# Altium PCB PCB_Adaptor_Board-v1.0.PcbDoc (part 2 of 2)
Units mil, origin at the board's own origin, x right, y up, seen from the top; angles counter-clockwise.
Board outline 5314.96 x 3492.31 mil, 2 copper layers (Top Layer, Bottom Layer), stack 61.811 mil thick; 18 components, 94 nets, 295 pads, 209 vias.
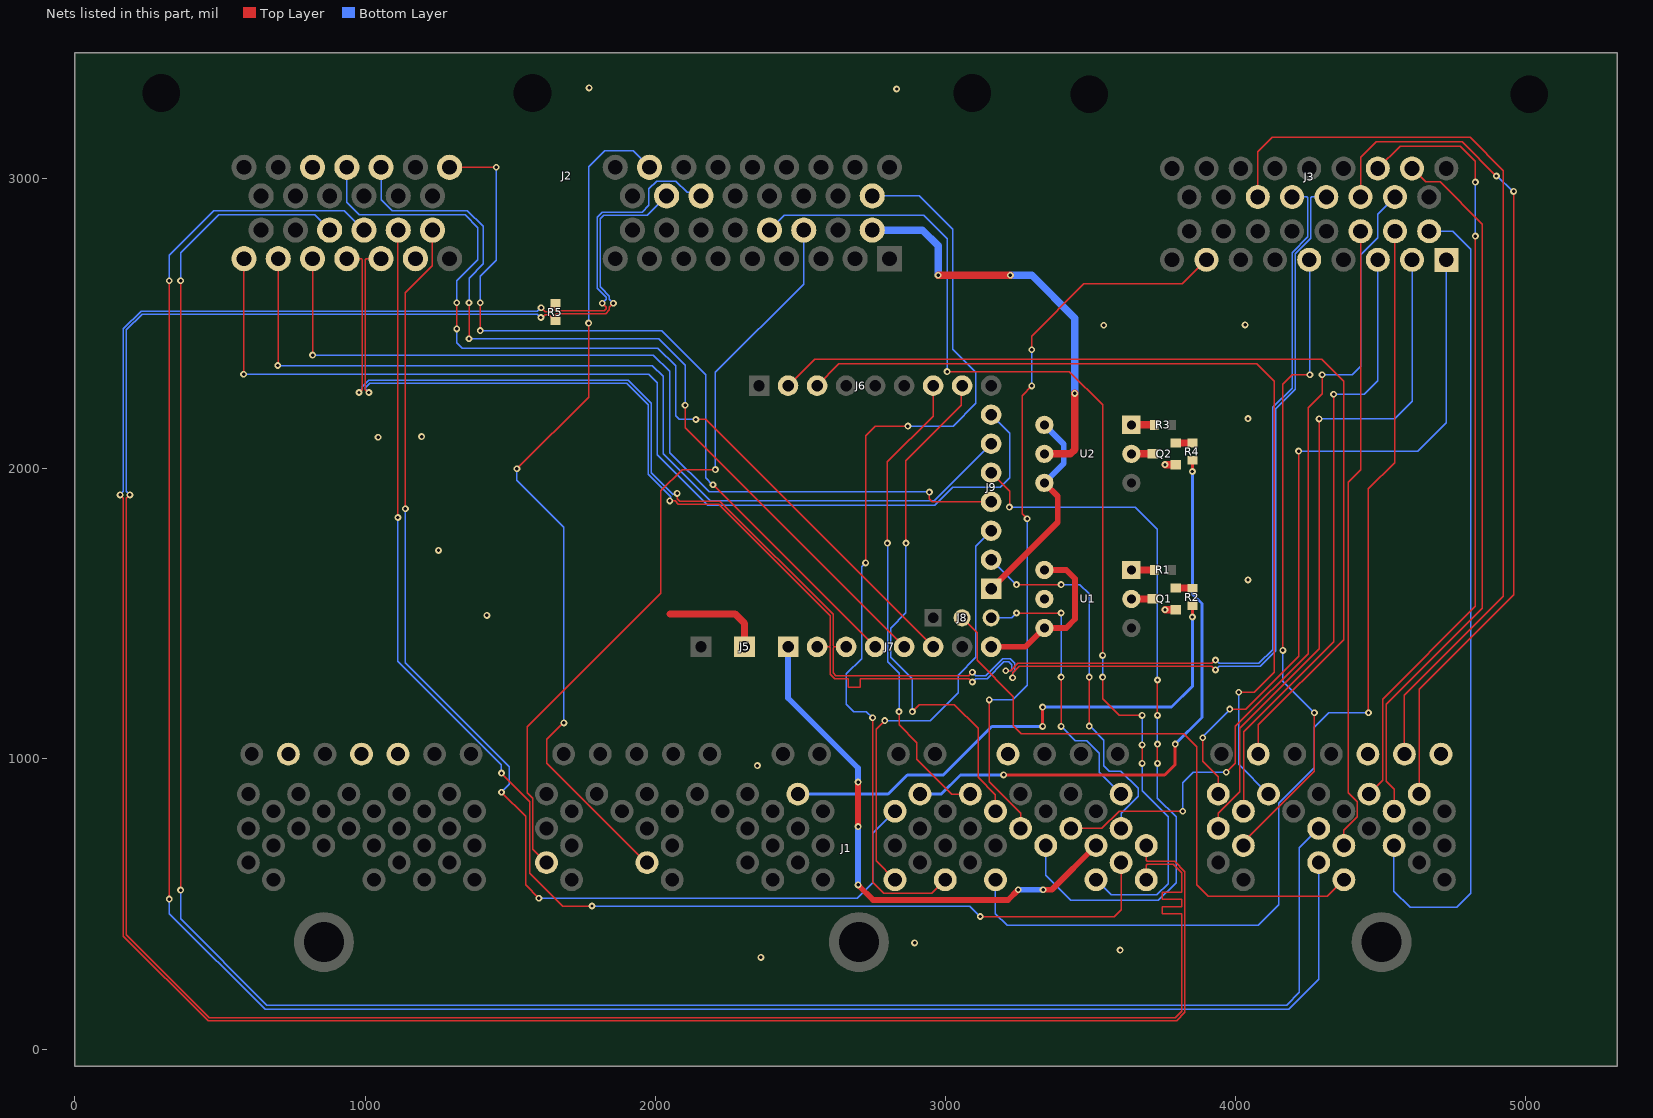
[diagram p2: the nets of this part, all layers, seen from the top]

## Via types
v1: diameter 23.62, hole 11.81, Top Layer to Bottom Layer, 209 vias

## Nets (pads, with @x,y where several pads share a name; then routed paths per layer and width w, separated by ;. In a path a pad name is that pad's centre, name@x,y a point inside that pad or via, vN(x,y) a via of type N, cw(c..) or ccw(c..) an arc to the next point about the centre after c; other vN are vias at no path point) (continued)
B33/A33: J1.B33 J2.A33 | length 2999.4
  Top Layer w5: v1(1523,2000) 1770.16,2247.16 v1(1770.16,2502.09) ; v1(1685.16,1124.12) 1682.12,1124.12 1625.39,1067.38 1625.39,985.76 1968.55,642.6 J1.B33@1971.84,642.6
  Bottom Layer w5: v1(1523,2000) 1523,1960.99 1685,1798.99 1685,1124.27 v1(1685.16,1124.12) v1@1685.16,1127.15 ; v1(1770.16,2502.09) v1(1770.16,2502.09) 1770.16,3040.87 1825.28,3096 1923.46,3096 J2.A33@1980.35,3039.12
B35/A12: J1.B35 J2.A12 | length 2669.9
  Top Layer w5: J1.B35@1625.39,642.6 1578.38,689.61 1578.38,864.25 1559.16,883.47 1559.16,1111.5 2019.38,1571.72 2019.38,1923.53 2093,1997.15 v1@2204.85,1997.15 ; v1@2204.85,1994.84 v1(2207.16,1997.15)
  Bottom Layer w5: v1(2207.16,1997.15) 2207.16,2332.18 2511.84,2636.87 J2.A12@2511.84,2822.58
C7/D-1: J1.C7 J8.3 | length 986.2
  Top Layer w5: v1(3245.16,1503) v1(3399,1503) ; v1(3399,1112.05) v1(3399,1282.26)
  Bottom Layer w5: J8.3@3157.74,1486.49 3228.65,1486.49 v1(3245.16,1503) ; v1(3399,1112.05) 3447.56,1063.48 3487.32,1063.48 3530.73,1020.07 3530.73,953.79 J1.C7@3605.7,878.82 ; v1(3399,1282.26) v1(3399,1503) ; v1@3406.16,1282.26 v1@3406.16,1287.3
C12/A-6: J1.C12 J6.8 | length 1837.1
  Top Layer w5: v1(2864.16,1744.15) 2864.16,2028.34 3054.49,2218.67 3054.49,2283.23 J6.8@3057.74,2286.49 ; v1(2886.15,1163.22) 2910.46,1187.53 3030.47,1187.53 3113,1105 3113,936.37 3172.63,876.74 J1.C12@3172.63,819.76
  Bottom Layer w5: v1(2864.16,1744.15) 2864.16,1503.67 2811.68,1451.18 2811.68,1351.06 2886.15,1276.58 v1(2886.15,1163.22)
C13/A-7: J1.C13 J6.7 | length 1628.4
  Top Layer w5: v1(2800.16,1744.15) 2800.16,2024.16 2957.74,2181.74 J6.7@2957.74,2286.49 ; v1(2840.15,1163.22) 2840.15,1118.5 2902,1056.65 2902,999.56 3022.74,878.82 J1.C13@3086.02,878.82
  Bottom Layer w5: v1(2800.16,1744.15) 2800.68,1743.63 2800.68,1335.32 2840.15,1295.85 v1(2840.15,1163.22)
C16/C8: J1.C16 J2.C8 | length 4005.1
  Top Layer w5: v1(1139.16,1862.15) 1138.52,1862.79 1138.52,2606.66 1232.31,2700.46 J2.C8@1232.31,2822.58 ; v1(1470.08,885.49) 1553.38,802.2 1553.38,565.75 v1(1599.04,520.08)
  Bottom Layer w5: v1(1139.16,1862.15) 1139.16,1331.36 1497.16,973.36 1497.16,912.57 v1(1470.08,885.49) ; v1(1599.04,520.08) 2696.08,520.08 2750,574 2750,743.59 J1.C16@2826.17,819.76
C18/A-3: J1.C18 J9.2 | length 1314.5
  Top Layer w5: v1(3245.16,1601.06) v1(3399,1601.06) ; v1(3495.74,1113.19) v1(3495.74,1282.26)
  Bottom Layer w5: J9.2@3157.74,1686.49 3158.73,1686.49 3244.17,1601.06 v1(3245.16,1601.06) ; v1(3399,1601.06) 3463.7,1601.06 3495.74,1569.01 v1(3495.74,1282.26) ; v1(3495.74,1113.19) 3496.72,1114.17 3545.73,1065.17 3545.73,977.24 3565.28,957.69 3605.05,957.69 3664.47,898.27 3664.47,871.31 3605.7,812.53 J1.C18@3605.7,760.71
C19/SGND: J1.C19 J7.1 | length 1839.8
  Top Layer w20: v1(2699,566) 2751,514 3216,514 v1(3251,549) ; v1(2699,767) v1(2699,920) ; v1(3336.86,549) 3366.43,549 J1.C19@3519.09,701.65
  Bottom Layer w20: J7.1@2457.74,1386.49 2457.74,1210.26 2699,969 v1(2699,920) ; v1(2699,566) v1(2699,767) ; v1(3251,549) v1(3336.86,549)
C20/B19: J1.C20 J3.B19 | length 2958
  Top Layer w5: J1.C20@3432.47,760.71 3539.41,760.71 3598.47,819.76 v1(3818,819.76) ; v1(3968.18,954.15) 3999.03,984.99 3999.03,1112.02 4250.16,1363.15 4250.16,2211.16 4298.16,2259.16 v1(4298.16,2324.15)
  Bottom Layer w5: v1(3818,819.76) 3818,918.19 3853.96,954.15 v1(3968.18,954.15) ; v1(4298.16,2324.15) 4402.15,2324.15 4431.13,2353.13 4431.13,2737.86 4490.19,2796.92 4490.19,2877.95 J3.B19@4549.24,2937.01
C21/A-5: J1.C21 J9.5 | length 2543.5
  Top Layer w5: J9.5@3157.74,1986.49 3221,1923.23 3221,1868.15 v1(3220.85,1868) ; v1(3731,984.8) v1(3731,1051.04) ; v1(3731,1150) v1(3731,1272)
  Bottom Layer w5: v1(3220.85,1868) 3655,1868 3731,1792 v1(3731,1272) ; J1.C21@3345.86,701.65 3345.86,599.14 3431.85,513.15 3734.15,513.15 3795.16,574.16 3795.16,800.77 3731,864.93 v1(3731,984.8) ; v1(3731,1051.04) v1(3731,1150)
C22/B8: J1.C22 J3.B8 | length 2575.1
  Top Layer w5: v1(3151,1203.38) 3151,920.78 3259.24,812.53 J1.C22@3259.24,760.71 ; v1(3281.73,1827.84) 3264.16,1845.41 3264.16,2252.51 v1(3297.66,2286.01) ; v1(3297.66,2410.15) 3297.66,2457.44 3477.48,2637.25 3816.42,2637.25 J3.B8@3899.64,2720.47
  Bottom Layer w5: v1(3151,1203.38) 3168.67,1203.64 3232,1203.64 3281.92,1253.56 3281.92,1827.65 v1(3281.73,1827.84) ; v1(3297.66,2286.01) v1(3297.66,2410.15)
C29/C9: J1.C29 J2.C9 | length 4676.1
  Top Layer w5: v1(1113.16,1832.15) 1113.16,2821.54 J2.C9@1114.2,2822.58 ; v1(1470.08,951.22) 1568.38,852.93 1568.38,606.02 1681.25,493.15 v1(1782.16,493.15) ; v1(3120,457) 3581.7,457 3605.7,481 J1.C29@3605.7,642.6
  Bottom Layer w5: v1(1113.16,1832.15) 1113.16,1336.15 1469.16,980.15 1469.16,952.15 v1(1470.08,951.22) ; v1(1782.16,493.15) 3083.85,493.15 v1(3120,457)
C30/A13: J1.C30 J2.A13 | length 3780.5
  Top Layer w5: v1(3006,2335) 3427.16,2335 3542,2220.16 v1(3542,1357) ; v1(3542,1282.26) 3542,1207 3599,1150 v1(3677.96,1150) ; v1(3677.96,984.8) v1(3677.96,1048.42)
  Bottom Layer w5: J2.A13@2393.73,2822.58 2444.54,2873.39 2925.61,2873.39 3006,2793 v1(3006,2335) ; J1.C30@3519.09,583.54 3571.48,531.15 3728.6,531.15 3768.16,570.7 3768.16,800.08 3677.96,890.28 v1(3677.96,984.8) ; v1(3542,1282.26) v1(3542,1357) ; v1@3677.96,1052.7 v1(3677.96,1150)
C31/B11: J1.C31 J3.B11 | length 3707.5
  Top Layer w5: v1(4458.16,1159.15) 4458.16,1930.65 4549.24,2021.73 J3.B11@4549.24,2818.9
  Bottom Layer w5: J1.C31@3172.63,583.54 3172.63,466.37 3212.85,426.15 4078.15,426.15 4149.48,497.48 4149.48,847.14 4272,969.66 4272,1110.04 4321.11,1159.15 v1(4458.16,1159.15)
C33/A18: J1.C33 J2.A18 | length 3299.1
  Top Layer w5: v1(2724.99,1675.67) 2724.99,2114.24 2757.74,2147 v1(2871,2147) ; v1(2749,1142.2) 2749.16,1142.04 2749.16,575.14 2787.62,536.67 2952.53,536.67 J1.C33@2999.4,583.54
  Bottom Layer w5: v1(2724.99,1675.67) 2711.16,1661.84 2711.16,1346.16 2658.85,1293.85 2658.85,1189.15 2684.78,1163.22 2728.09,1163.22 2749,1142.3 v1(2749,1142.2) ; J2.A18@2748.06,2940.69 2910.61,2940.69 3026,2825.31 3026,2411.62 3104.81,2332.81 3104.81,2225.34 3026.47,2147 v1(2871,2147)
C35/A-4: J1.C35 J9.3 | length 1486.3
  Top Layer w5: v1(2791.09,1132.15) 2761.16,1102.22 2761.16,648.56 J1.C35@2826.17,583.54
  Bottom Layer w5: v1(2791.09,1132.15) 2948.46,1132.15 3044,1227.69 3044,1289.07 3105,1350.07 3105,1733.75 J9.3@3157.74,1786.49
CAN1_N: J2.C4 J3.B21 J7.3 | length 6265.3
  Top Layer w5: J2.C4@937.04,2724.16 988.02,2724.16 990.94,2721.23 990.94,2273 980.87,2262.93 v1(979.12,2262.93) ; v1(2075.56,1915.07) 2075.56,1896.59 2084.15,1888 2223.16,1888 2612.89,1498.27 2612.89,1389.42 2615.82,1386.49 ; J7.3@2657.74,1386.49 2615.82,1386.49 ; v1(3093.18,1298.96) 3092.42,1298.96 3080.76,1287.3 2622.31,1287.3 2612.89,1296.72 2612.89,1383.56 2615.82,1386.49 ; v1(3231.9,1280.1) 3232.43,1280.64 3232.43,1297.13 3254,1318.7 3327.47,1318.7 3918.58,1318.7 3930.24,1307.04 v1(3931,1307.04)
  Bottom Layer w5: v1(979.12,2262.93) 979.12,2263.36 990.94,2275.18 990.94,2283.59 1012.66,2305.3 1906.27,2305.3 1962.28,2249.28 1986.3,2225.27 1986.3,1985.85 2061.57,1910.57 2062.51,1911.51 2072,1911.51 v1(2075.56,1915.07) ; v1(3093.18,1298.96) 3093.93,1298.96 3105.3,1287.6 3105,1287.3 3139.73,1287.3 3197.73,1345.3 3223.27,1345.3 3239.3,1329.27 3239.3,1304 3232.43,1297.13 3232.43,1280.64 v1(3231.9,1280.1) ; v1(3931,1307.04) 3931.76,1307.04 3943.42,1318.7 4084.92,1318.7 4138.79,1372.57 4138.79,2207.49 4205.13,2273.83 4205.13,2740.7 4259.12,2794.69 4259.12,2934.08 4262.05,2937.01 J3.B21@4313.02,2937.01
CAN1_P: J2.C3 J3.B22 J7.2 | length 6275.2
  Top Layer w5: v1(1013.07,2262.93) 1011.32,2262.93 1001.24,2273 1001.24,2721.23 1004.17,2724.16 J2.C3@1055.15,2724.16 ; v1(2049.8,1889.31) 2068.28,1889.31 2079.88,1877.7 2218.89,1877.7 2602.59,1494 2602.59,1389.42 2599.66,1386.49 ; J7.2@2557.74,1386.49 2599.66,1386.49 ; v1(3093.18,1265.34) 3092.42,1265.34 3080.76,1277 2721.11,1277 2705.78,1277 2705.78,1246.42 2665.78,1246.42 2665.78,1277 2623.28,1277 2618.04,1277 2602.59,1292.45 2602.59,1383.56 2599.66,1386.49 ; v1(3208.12,1303.88) 3208.66,1304.42 3225.15,1304.42 3249.73,1329 3327.47,1329 3918.58,1329 3930.24,1340.66 v1(3931,1340.66)
  Bottom Layer w5: v1(1013.07,2262.93) 1013.07,2263.36 1001.24,2275.18 1001.24,2279.32 1016.92,2295 1902,2295 1958.64,2238.36 1976,2221 1976,1981.58 2038.19,1919.39 2054.29,1903.29 2053.36,1902.36 2053.36,1892.87 v1(2049.8,1889.31) ; v1(3093.18,1265.34) 3093.93,1265.34 3105.3,1276.7 3105,1277 3144,1277 3202,1335 3219,1335 3229,1325 3229,1308.27 3225.15,1304.42 3208.66,1304.42 v1(3208.12,1303.88) ; v1(3931,1340.66) 3931.76,1340.66 3943.42,1329 4080.65,1329 4128.49,1376.84 4128.49,2211.76 4194.83,2278.1 4194.83,2744.97 4248.82,2798.96 4248.82,2934.08 4245.89,2937.01 J3.B22@4194.91,2937.01
CANHH_N: J1.C28 J2.A24 R5.2 | length 9130.9
  Top Layer w5: v1(189.32,1910.15) 189.32,1909.39 177.66,1897.73 177.66,393.65 463.16,108.15 3792.58,108.15 3815.16,130.72 3815.16,433.69 3815.16,466 3746.72,466 3746.72,491 3815.16,491 3815.16,516 3746.72,516 3746.72,541 3815.16,541 3815.16,568.5 3815.16,607.84 3785.55,637.45 3695.24,637.45 3692.31,634.52 J1.C28@3692.31,583.54 ; v1(1606.16,2521.47) 1611.2,2521.47 1620.38,2530.65 1633.15,2530.65 1653.66,2510.15 R5.2@1656.16,2510.15 1656.16,2532.07 1659.09,2535 1829.01,2535 1841.74,2547.73 1841.74,2556.66 v1(1855.75,2570.67)
  Bottom Layer w5: v1(189.32,1910.15) 189.32,1910.91 177.66,1922.57 177.66,2478.66 232.13,2533.13 1593.74,2533.13 1605.4,2521.47 v1(1606.16,2521.47) ; v1(1855.75,2570.67) 1841.74,2584.68 1841.74,2595.54 1813.6,2623.68 1810.46,2626.83 1810.46,2862.66 1822.04,2874.24 1972.95,2874.24 J2.A24@2039.4,2940.69
CANHH_P: J1.C17 J2.A23 R5.1 | length 9125.6
  Top Layer w5: v1(155.7,1910.15) 155.7,1909.39 167.36,1897.73 167.36,389.38 458.89,97.85 3792.58,97.85 3796.85,97.85 3825.46,126.46 3825.46,612.11 3789.82,647.75 3695.24,647.75 3692.31,650.68 J1.C17@3692.31,701.65 ; v1(1606.48,2555.09) 1606.92,2555.09 1621.06,2540.95 1633.13,2540.95 1641.16,2548.98 1641.16,2557.65 1653.66,2570.15 R5.1@1656.16,2570.15 1656.16,2548.23 1659.09,2545.3 1721.56,2545.3 1824.74,2545.3 1826.56,2547.11 1831.44,2552 1831.44,2556.66 v1(1817.43,2570.67)
  Bottom Layer w5: v1(155.7,1910.15) 155.7,1910.91 167.36,1922.57 167.36,2482.92 227.87,2543.43 1593.74,2543.43 1605.4,2555.09 v1(1606.48,2555.09) ; v1(1817.43,2570.67) 1831.44,2584.68 1831.44,2591.28 1803.3,2619.42 1800.16,2622.56 1800.16,2866.92 1817.78,2884.54 1954.82,2884.54 1978,2907.72 1978,2964.92 2004.58,2991.5 2070.5,2991.5 2109.63,2952.37 2145.84,2952.37 J2.A23@2157.51,2940.69
D2/B23: J1.D2 J3.B23 | length 3222.5
  Top Layer w5: J3.B23@4076.8,2937.01 4076.8,3092.8 4126,3142 4808.93,3142 4923.47,3027.46 4923.47,1560.47 4582.07,1219.07 J1.D2@4582.07,1016.61
D6/OUT-2: J1.D6 J6.2 | length 3391.1
  Top Layer w5: J6.2@2457.74,2286.49 2549.25,2378 4296.31,2378 4372.16,2302.15 4372.16,1411.16 4078.14,1117.14 J1.D6@4078.14,1016.61
D9/B20: J1.D9 J3.B20 | length 2969.3
  Top Layer w5: J3.B20@4431.13,2937.01 4431.13,3074.13 4484.71,3127.7 4780.61,3127.7 v1(4899.16,3009.15) ; J1.D9@4633.26,878.82 4633.26,1240.25 4958.16,1565.15 v1(4958.16,2956.15)
  Bottom Layer w5: v1(4899.16,3009.15) 4902.16,3009.15 4955.16,2956.15 v1(4958.16,2956.15)
D10/B27: J1.D10 J3.B27 | length 2493.7
  Top Layer w5: J1.D10@4546.64,819.76 4546.64,896.36 4520.2,922.8 4520.2,1189.2 4851.16,1520.16 4851.16,2842.84 4705.1,2988.9 4654.83,2988.9 J3.B27@4608.3,3035.43
D11/B28: J1.D11 J3.B28 | length 2734.3
  Top Layer w5: J1.D11@4460.03,878.82 4507.27,926.06 4507.27,1206.27 4826.85,1525.85 v1(4826.85,2801.84) ; J3.B28@4490.19,3035.43 4566.91,3112.15 4774.94,3112.15 4826.85,3060.25 v1(4826.85,2988.35)
  Bottom Layer w5: v1@4826.85,2790.84 v1(4826.85,2801.84) v1(4826.85,2988.35)
D15/OUT-3: J1.D15 J6.3 | length 3178.5
  Top Layer w5: J6.3@2557.74,2286.49 2632.74,2361.49 4073.82,2361.49 4133.16,2302.15 4133.16,1299.16 4064,1230 v1(4011,1230)
  Bottom Layer w5: v1(4011,1230) 4011,981.39 J1.D15@4113.57,878.82
D16/B3: J1.D16 J3.B3 | length 2154.1
  Top Layer w5: J1.D16@4026.96,819.76 4029.03,821.83 4029.03,1094.03 4338.16,1403.16 v1(4338.16,2257.15)
  Bottom Layer w5: v1(4338.16,2257.15) 4443.15,2257.15 4490.19,2304.19 J3.B3@4490.19,2720.47
D17/B1: J1.D17 J3.B1 | length 2484.8
  Top Layer w5: v1(3887.16,1073.15) 3887.16,991.25 3940.34,938.06 J1.D17@3940.34,878.82 ; v1(3979.99,1171.94) 4035.94,1171.94 4217.16,1353.16 v1(4217.16,2061.15)
  Bottom Layer w5: v1(3887.16,1073.15) 3887.16,1076.13 3979.99,1168.97 v1(3979.99,1171.94) ; v1(4217.16,2061.15) 4628.15,2061.15 4726.41,2159.41 J3.B1@4726.41,2720.47
D20/B10: J1.D20 J3.B10 | length 2852.6
  Top Layer w5: J1.D20@4546.4,701.41 J1.D20@4546.64,701.65
  Bottom Layer w5: J1.D20@4546.64,701.65 4546.16,701.17 4546.16,544.84 4601.85,489.15 4762.15,489.15 4810.16,537.16 4810.16,2757.01 4748.27,2818.9 J3.B10@4667.35,2818.9
D22/B12: J1.D22 J3.B12 | length 2167.1
  Top Layer w5: J1.D22@4373.41,701.65 4373.41,753.48 4420.28,800.35 4420.28,852.28 4389,883.56 4389,1953.99 4431.13,1996.13 J3.B12@4431.13,2818.9
D23/C11: J1.D23 J2.C11 | length 7476.6
  Top Layer w5: v1(364,548.16) v1(364,2648.16)
  Bottom Layer w5: v1(364,548.16) 364,449.31 661.47,151.84 4176.23,151.84 4220,195.6 4220,693.91 J1.D23@4286.8,760.71 ; v1@364,2646.28 364,2744 494.89,2874.89 825.68,2874.89 J2.C11@877.98,2822.58
D24/B5: J1.D24 J3.B5 | length 2240
  Top Layer w5: J1.D24@4026.96,701.65 4026.96,712.82 4272,957.86 v1(4272,1159.15) ; v1(4163.1,1374.15) 4163.1,2291.1 4196.15,2324.15 v1(4256.16,2324.15)
  Bottom Layer w5: v1(4163.1,1374.15) 4163.1,1268.05 v1(4272,1159.15) ; J3.B5@4253.97,2720.47 4256.16,2718.28 v1(4256.16,2324.15)
D25/B2: J1.D25 J3.B2 | length 2388.7
  Top Layer w5: J1.D25@3940.34,760.71 3940.34,812.53 4014.03,886.21 4014.03,1105.8 4288.16,1379.94 v1(4288.16,2172.15)
  Bottom Layer w5: v1(4288.16,2172.15) 4548.15,2172.15 4608.3,2232.3 J3.B2@4608.3,2720.47
D28/A-0: J1.D28 J8.2 | length 2129.9
  Top Layer w5: J8.2@3057.74,1486.49 3108.99,1435.24 3108.99,1339.64 3234,1214.63 3234,1115 3261.27,1087.73 3821.57,1087.73 3866.9,1042.4 3866.9,566.12 3906.04,526.98 4316.85,526.98 J1.D28@4373.41,583.54
D29/C10: J1.D29 J2.C10 | length 7575.1
  Top Layer w5: v1(325,517) v1(325,2648.16)
  Bottom Layer w5: v1(325,517) 325,467.09 655.26,136.84 4182.84,136.84 4286.8,240.8 J1.D29@4286.8,642.6 ; v1(325,2648.16) 325,2736 478.89,2889.89 928.79,2889.89 J2.C10@996.09,2822.58
D-2/C5: J2.C5 J9.4 | length 3058
  Top Layer w5: v1(819,2392) J2.C5@818.93,2724.16 ; v1(2944.75,1919.56) 2944.75,1896.17 2954.43,1886.49 J9.4@3157.74,1886.49
  Bottom Layer w5: v1(819,2392) 1994.01,2392 2050,2336.01 2050,2056 2185.85,1920.15 2944.16,1920.15 v1(2944.75,1919.56)
D-3/C6: J2.C6 J9.6 | length 3258.4
  Top Layer w5: v1(699.16,2356) 699.99,2356.83 699.99,2723.33 J2.C6@700.82,2724.16
  Bottom Layer w5: v1(699.16,2356) 1990.31,2356 2027,2319.31 2027,2052 2189,1890 2961.25,1890 J9.6@3157.74,2086.49
D-4/C7: J2.C7 J9.7 | length 3655.1
  Top Layer w5: v1(581.16,2326) 581.16,2722.61 J2.C7@582.71,2724.16
  Bottom Layer w5: v1(581.16,2326) 1976.98,2326 2007,2295.98 2007,2048 2180.39,1874.61 2963.61,1874.61 3025.49,1936.49 3189.59,1936.49 3222,1968.9 3222,2122.23 J9.7@3157.74,2186.49
DTR/C20: J2.C20 J7.4 | length 2760.7
  Top Layer w5: J2.C20@1291.37,3039.12 v1(1452,3039.12) ; v1@1397.16,2482.15 v1(1397.16,2572.15) ; v1(2199.16,1945.15) J7.4@2757.74,1386.53
  Bottom Layer w5: v1(1397.16,2476.15) 2022.16,2476.15 2174.16,2324.15 2174.16,1968.33 2197.34,1945.15 v1(2199.16,1945.15) ; v1(1397.16,2572.15) 1397.16,2664.16 1452,2719 v1(1452,3039.12)
GND: J1.A3 J1.A4 J1.A6 J1.C4 J1.D1 J1.D3 J2.A10 J2.C2 J2.C24 J5.1 Q1.2 Q2.2 U1.5 U2.5 | length 1871.6
  Top Layer w25: 2051,1500 2275,1500 2307.74,1467.26 J5.1@2307.74,1386.49 ; v1(2975,2667) v1(3224,2667) ; U2.5@3340.99,2051.49 3431.36,2051.49 3446,2066.13 v1(3446,2260) ; v1(3757.04,1514.25) Q1.2@3793.53,1514.25 ; v1(3757.04,2014.25) Q2.2@3793.53,2014.25
  Bottom Layer w25: J2.A10@2748.06,2822.58 2921.42,2822.58 2975,2769 v1(2975,2667) ; v1(3224,2667) 3298.25,2667 3446,2519.25 v1(3446,2260)
  other v1: 2364,316 3602,341 2894,366 2351.99,977.24 1420,1495 4043,1617 1253,1719 1045,2109 1195,2111 4043,2173 3546,2495 4033,2496 2832,3309 1772,3313
NetQ1_1: Q1.1 R2.2 | length 55.7
  Top Layer w25: Q1.1@3793.53,1589.05 R2.2@3849.19,1589.15
NetQ1_3: Q1.3 U1.2 | length 85.5
  Top Layer w20: U1.2@3641.07,1551.57 U1.2@3640.99,1551.49 U1.2@3652.63,1551.49 ; Q1.3@3714.71,1551.57 Q1.3@3714.79,1551.65
  Top Layer w25: U1.2@3641.07,1551.57 Q1.3@3714.71,1551.57
NetQ2_1: Q2.1 R4.2 | length 57.6
  Top Layer w25: Q2.1@3793.53,2089.05 3795.5,2089.05 R4.2@3851.16,2089.15
NetQ2_3: Q2.3 U2.2 | length 73.9
  Top Layer w20: U2.2@3640.99,2051.49 U2.2@3641.07,2051.57 ; Q2.3@3714.71,2051.57 Q2.3@3714.79,2051.65
  Top Layer w25: U2.2@3641.07,2051.57 Q2.3@3714.71,2051.57
NetR1_1: R1.1 U1.1 | length 79.3
  Top Layer w25: U1.1@3640.99,1651.49 R1.1@3720.29,1651.49
NetR3_1: R3.1 U2.1 | length 79.3
  Top Layer w25: U2.1@3640.99,2151.49 R3.1@3720.29,2151.49
RX/C23: J2.C23 J7.6 | length 3212
  Top Layer w5: v1(1316.16,2482.15) v1(1316.16,2572.15) ; v1(2140.16,2170) 2174.23,2170 J7.6@2957.74,1386.49
  Bottom Layer w5: J2.C23@937.04,3039.12 937.04,2918.32 980.47,2874.89 1345.11,2874.89 1389.16,2830.84 1389.16,2721.16 1316.16,2648.16 v1(1316.16,2572.15) ; v1(1316.16,2482.15) 1316.16,2434.84 1335,2416 2008.99,2416 2070,2354.99 2070,2183 2083,2170 v1(2140.16,2170)
SSR_IN_1: J1.B9 R2.1 | length 1830
  Top Layer w10: v1(3335.16,1112.05) v1(3335.16,1178.65) ; v1(3851.16,1489.13) R2.1@3851.16,1527.63
  Bottom Layer w10: J1.B9@2491.53,878.82 2802.82,878.82 2868.84,944.84 2992.93,944.84 3160.13,1112.05 v1(3335.16,1112.05) ; v1(3335.16,1178.65) 3779.7,1178.65 3851.16,1250.11 v1(3851.16,1489.13)
SSR_IN_2: J1.C15 R4.1 | length 2021.4
  Top Layer w10: v1(3200.47,944.84) 3755.84,944.84 3792.05,981.05 v1(3792.05,1051.04) ; v1(3851.16,1990.65) R4.1@3851.16,2029.15
  Bottom Layer w10: J1.C15@2912.79,878.82 2985.96,878.82 3051.98,944.84 v1(3200.47,944.84) ; v1(3792.05,1051.04) 3884,1142.99 3884,1536 3851.16,1568.84 v1(3851.16,1990.65)
SSR_OUT_1: J7.8 U1.4 U1.6 | length 586.8
  Top Layer w20: J7.8@3157.74,1386.49 3275.99,1386.49 U1.4@3340.99,1451.49 3416.5,1451.49 3447.16,1482.15 3447.16,1621.15 3416.82,1651.49 U1.6@3340.99,1651.49
SSR_OUT_2: J9.1 U2.4 U2.6 | length 745.4
  Top Layer w20: J9.1@3157.74,1586.49 3387,1815.75 3387,1905.48 U2.4@3340.99,1951.49 ; U2.6@3340.99,2151.49 U2.6@3348.67,2143.81
  Bottom Layer w20: U2.4@3340.99,1951.49 3408,2018.5 3408,2084.48 U2.6@3340.99,2151.49
TX/C22: J2.C22 J7.5 | length 2974.7
  Top Layer w5: v1(1358.16,2448) v1(1358.16,2572.15) ; v1(2103,2219) 2103,2141.23 J7.5@2857.74,1386.49
  Bottom Layer w5: J2.C22@1055.15,3039.12 1055.15,2927.9 1093.16,2889.89 1352.48,2889.89 1407,2835.36 1407,2706 1358.16,2657.16 v1(1358.16,2572.15) ; v1(1358.16,2448) 2012,2448 2103,2357 v1(2103,2219)
pads on no net: J1.A8 J1.A9 J1.A20 J1.A30 J1.B1 J1.B2 J1.B3 J1.B4 J1.B5 J1.B8 J1.B10 J1.B14 J1.B16 J1.B18 J1.B19 J1.B24 J1.B25 J1.B27 J1.B28 J1.B34 J1.C2 J1.C3 J1.C8 J1.C9 J1.C14 J1.C23 J1.C24 J1.C25 J1.C26 J1.C27 J1.C32 J1.C34 J1.D4 J1.D5 J1.D12 J1.D13 J1.D14 J1.D18 J1.D19 J1.D21 J1.D26 J1.D27 J1.MH1 J1.MH2 J1.MH3 J2. J2.A26 J3. J3.B4 J3.B9 J3.B24 J3.B29 J3.B30 J3.B31 J3.B32 J3.B33 J3.B34 J6.4 J6.5 J6.6 J7.7 U1.3 U2.3

## Polygon pours and split planes (outlines as drawn)
GND on Bottom Layer "GND_L02_P000" (solid, remove dead copper, pour order 0): 41,3399 41,-20 5275,-20 5275,3399
GND on Top Layer "GND_L01_P001" (solid, remove dead copper, pour order 1): 41,3399 41,-20 5276,-20 5276,3399

## Other copper
Top Layer:
  pour cut-out: 1251.37,690 1251.37,536.69 1361.06,427 2342.86,427 2564.01,648.15 2487.52,724.64 2243.04,480.15 1403.85,480.15 1331.35,552.65 1331.35,690

## Silkscreen, mask and mechanical layers (free items; w line width, h text height)
Dimension:
  drawing of 200 lines, arcs and shapes, not listed
Board Outline:
  the board outline again, w30
Fabrication Info:
  drawing of 191 lines, arcs and shapes, not listed
  text "Layer" at 5732.34,1266 h60
  text "Name" at 6142.26,1266 h60
  text "Material" at 7072,1266 h60
  text "Thickness" at 7931.77,1266 h60
  text "Constant" at 8581.6,1266 h60
  text "Board Layer Stack" at 9151.46,1266 h60
  text "Top Overlay" at 6142.26,1146 h60
  text "Top Solder" at 6142.26,1026 h60
  text "Solder Resist" at 7072,1026 h60
  text "0.39mil" at 7931.77,1026 h60
  text "3.5" at 8581.6,1026 h60
  text "1" at 5732.34,906 h60
  text "Top Layer" at 6142.26,906 h60
  text "1.38mil" at 7931.77,906 h60
  text "Dielectric 1" at 6142.26,786 h60
  text "FR-4" at 7072,786 h60
  text "59.06mil" at 7931.77,786 h60
  text "4.8" at 8581.6,786 h60
  text "2" at 5732.34,666 h60
  text "Bottom Layer" at 6142.26,666 h60
  text "1.38mil" at 7931.77,666 h60
  text "Bottom Solder" at 6142.26,546 h60
  text "Solder Resist" at 7072,546 h60
  text "0.39mil" at 7931.77,546 h60
  text "3.5" at 8581.6,546 h60
  text "Bottom Overlay" at 6142.26,426 h60
  text "Total board thickness:" at 5732.34,306 h60
  text "62.60mil" at 7931.77,306 h60
Mechanical 4:
  circle w0.5: c2182.74,2261.49 r62.99
  lines w0.5: 2132.74,1311.49 cw(c2132.74,1361.49) 2082.74,1361.49 2082.74,2311.49 cw(c2132.74,2311.49) 2132.74,2361.49 3182.74,2361.49 cw(c3182.74,2311.49) 3232.74,2311.49 3232.74,1361.49 cw(c3182.74,1361.49) 3182.74,1311.49
Mechanical 5:
  drawing of 228 lines, arcs and shapes, not listed
Mechanical 6:
  drawing of 228 lines, arcs and shapes, not listed
Mechanical 9:
  drawing of 343 lines, arcs and shapes, not listed
Drill Drawing:
  circle w10: c5749.62,2672.83 r20
  circle w10: c5749.62,2672.83 r33.33
  circle w10: c5749.62,2372.83 r33.33
  lines w10: 5716.29,2056.17 5732.96,2056.17 5749.62,2039.5 5766.29,2056.17 5782.96,2056.17 5766.29,2072.83 5782.96,2089.5 5766.29,2089.5 5749.62,2106.17 5732.96,2089.5 5716.29,2089.5 5732.96,2072.83 5716.29,2056.17 ; 5716.29,2189.5 5782.96,2189.5 5782.96,2256.17 5716.29,2256.17 5716.29,2189.5 ; 5716.29,2556.17 5782.96,2556.17 5749.62,2489.5 5716.29,2556.17 ; 5716.29,2789.5 5716.29,2806.17 5732.96,2822.83 5716.29,2839.5 5716.29,2856.17 5732.96,2856.17 5749.62,2839.5 5766.29,2856.17 5782.96,2856.17 5782.96,2839.5 5766.29,2822.83 5782.96,2806.17 5782.96,2789.5 5766.29,2789.5 5749.62,2806.17 5732.96,2789.5 5716.29,2789.5 ; 5716.29,2939.5 5749.62,2956.17 5782.96,2939.5 5766.29,2972.83 5782.96,3006.17 5749.62,2989.5 5716.29,3006.17 5732.96,2972.83 5716.29,2939.5 ; 5716.29,3089.5 5782.96,3089.5 5782.96,3156.17 5716.29,3156.17 5716.29,3089.5 ; 5729.62,3102.83 5769.62,3102.83 5769.62,3142.83 5729.62,3142.83 5729.62,3102.83
  lines w15: 5656.5,1994.5 15649.71,1994.5 ; 5656.5,3194.5 15649.71,3194.5 ; 6207.38,1844.5 6207.38,3344.5 ; 6807.22,1844.5 6807.22,3344.5 ; 7956.88,1844.5 7956.88,3344.5 ; 8462.76,1844.5 8462.76,3344.5 ; 9196.56,1844.5 9196.56,3344.5 ; 10696.11,1844.5 10696.11,3344.5 ; 11285.96,1844.5 11285.96,3344.5 ; 12031.76,1844.5 12031.76,3344.5 ; 13381.35,1844.5 13381.35,3344.5 ; 14247.11,1844.5 14247.11,3344.5 ; 5656.5,1844.5 15649.71,1844.5 15649.71,3344.5 5656.5,3344.5 5656.5,1844.5
  text "Symbol" at 5746.5,3239.5 h72
  text "Count" at 6252.38,3239.5 h72
  text "Hole Size" at 6852.22,3239.5 h72
  text "Plated" at 8001.88,3239.5 h72
  text "Hole Type" at 8507.76,3239.5 h72
  text "Drill Layer Pair" at 9241.56,3239.5 h72
  text "Via/Pad" at 10741.11,3239.5 h72
  text "Pad Shape" at 11330.96,3239.5 h72
  text "Template" at 12076.76,3239.5 h72
  text "Hole Length" at 13426.35,3239.5 h72
  text "Routed Path Length" at 14292.11,3239.5 h72
  text "209" at 6252.38,3089.5 h60
  text "11.81mil (0.300mm)" at 6852.22,3089.5 h60
  text "PTH" at 8001.88,3089.5 h60
  text "Round" at 8507.76,3089.5 h60
  text "Top Layer - Bottom Layer" at 9241.56,3089.5 h60
  text "Via" at 10741.11,3089.5 h60
  text "Rounded" at 11330.96,3089.5 h60
  text "v60h30" at 12076.76,3089.5 h60
  text "-" at 13426.35,3089.5 h60
  text "-" at 14292.11,3089.5 h60
  text "12" at 6252.38,2939.5 h60
  text "31.50mil (0.800mm)" at 6852.22,2939.5 h60
  text "PTH" at 8001.88,2939.5 h60
  text "Round" at 8507.76,2939.5 h60
  text "Top Layer - Bottom Layer" at 9241.56,2939.5 h60
  text "Pad" at 10741.11,2939.5 h60
  text "Rounded" at 11330.96,2939.5 h60
  text "(Mixed)" at 12076.76,2939.5 h60
  text "-" at 13426.35,2939.5 h60
  text "-" at 14292.11,2939.5 h60
  text "3" at 6252.38,2789.5 h60
  text "35.43mil (0.900mm)" at 6852.22,2789.5 h60
  text "PTH" at 8001.88,2789.5 h60
  text "Round" at 8507.76,2789.5 h60
  text "Top Layer - Bottom Layer" at 9241.56,2789.5 h60
  text "Pad" at 10741.11,2789.5 h60
  text "(Mixed)" at 11330.96,2789.5 h60
  text "(Mixed)" at 12076.76,2789.5 h60
  text "-" at 13426.35,2789.5 h60
  text "-" at 14292.11,2789.5 h60
  text "26" at 6252.38,2639.5 h60
  text "39.37mil (1.000mm)" at 6852.22,2639.5 h60
  text "PTH" at 8001.88,2639.5 h60
  text "Round" at 8507.76,2639.5 h60
  text "Top Layer - Bottom Layer" at 9241.56,2639.5 h60
  text "Pad" at 10741.11,2639.5 h60
  text "(Mixed)" at 11330.96,2639.5 h60
  text "(Mixed)" at 12076.76,2639.5 h60
  text "-" at 13426.35,2639.5 h60
  text "-" at 14292.11,2639.5 h60
  text "135" at 6252.38,2489.5 h60
  text "47.64mil (1.210mm)" at 6852.22,2489.5 h60
  text "PTH" at 8001.88,2489.5 h60
  text "Round" at 8507.76,2489.5 h60
  text "Top Layer - Bottom Layer" at 9241.56,2489.5 h60
  text "Pad" at 10741.11,2489.5 h60
  text "Rounded" at 11330.96,2489.5 h60
  text "c200h121m200mx200p200" at 12076.76,2489.5 h60
  text "-" at 13426.35,2489.5 h60
  text "-" at 14292.11,2489.5 h60
  text "95" at 6252.38,2339.5 h60
  text "51.18mil (1.300mm)" at 6852.22,2339.5 h60
  text "PTH" at 8001.88,2339.5 h60
  text "Round" at 8507.76,2339.5 h60
  text "Top Layer - Bottom Layer" at 9241.56,2339.5 h60
  text "Pad" at 10741.11,2339.5 h60
  text "(Mixed)" at 11330.96,2339.5 h60
  text "(Mixed)" at 12076.76,2339.5 h60
  text "-" at 13426.35,2339.5 h60
  text "-" at 14292.11,2339.5 h60
  text "5" at 6252.38,2189.5 h60
  text "129.92mil (3.300mm)" at 6852.22,2189.5 h60
  text "NPTH" at 8001.88,2189.5 h60
  text "Round" at 8507.76,2189.5 h60
  text "Top Layer - Bottom Layer" at 9241.56,2189.5 h60
  text "Pad" at 10741.11,2189.5 h60
  text "Rounded" at 11330.96,2189.5 h60
  text "c0hn330" at 12076.76,2189.5 h60
  text "-" at 13426.35,2189.5 h60
  text "-" at 14292.11,2189.5 h60
  text "3" at 6252.38,2039.5 h60
  text "137.79mil (3.500mm)" at 6852.22,2039.5 h60
  text "PTH" at 8001.88,2039.5 h60
  text "Round" at 8507.76,2039.5 h60
  text "Top Layer - Bottom Layer" at 9241.56,2039.5 h60
  text "Pad" at 10741.11,2039.5 h60
  text "Rounded" at 11330.96,2039.5 h60
  text "c525h350m525mx525p525" at 12076.76,2039.5 h60
  text "-" at 13426.35,2039.5 h60
  text "-" at 14292.11,2039.5 h60
  text "488 Total" at 6252.38,1889.5 h60

## Dimensions
0,-59 to 0,3433.31 on Dimension
5314.96,-59 to 0,-59 on Dimension

## Text inside footprints (layer, text, board x,y; h text height)
J1: Top Overlay "D1" at 4767.11,996.65 h39.37; Top Overlay "C1" at 3652.94,996.65 h39.37; Top Overlay "B1" at 2625.39,996.65 h39.37; Top Overlay "A1" at 1424.6,996.65 h39.37
J2: Top Overlay "A1" at 2875.87,2705.87 h39.37; Top Overlay "PCB Edge" at 2668.91,3381.47 h39.37 r180
J3: Top Overlay "PCB Edge" at 4540.97,3386.79 h39.37 r180